# Altium PCB RP2040_PCB_V1T1.PcbDoc
Units mil, origin at the board's own origin, x right, y up, seen from the top; angles counter-clockwise.
Board outline 1385.83 x 2165.35 mil, 4 copper layers (Top Layer, Int1 (GND), Int2 (PWR), Bottom Layer), stack 63.141 mil thick; 53 components, 62 nets, 224 pads, 78 vias.
Unrouted connection lines stored in the file: 2.
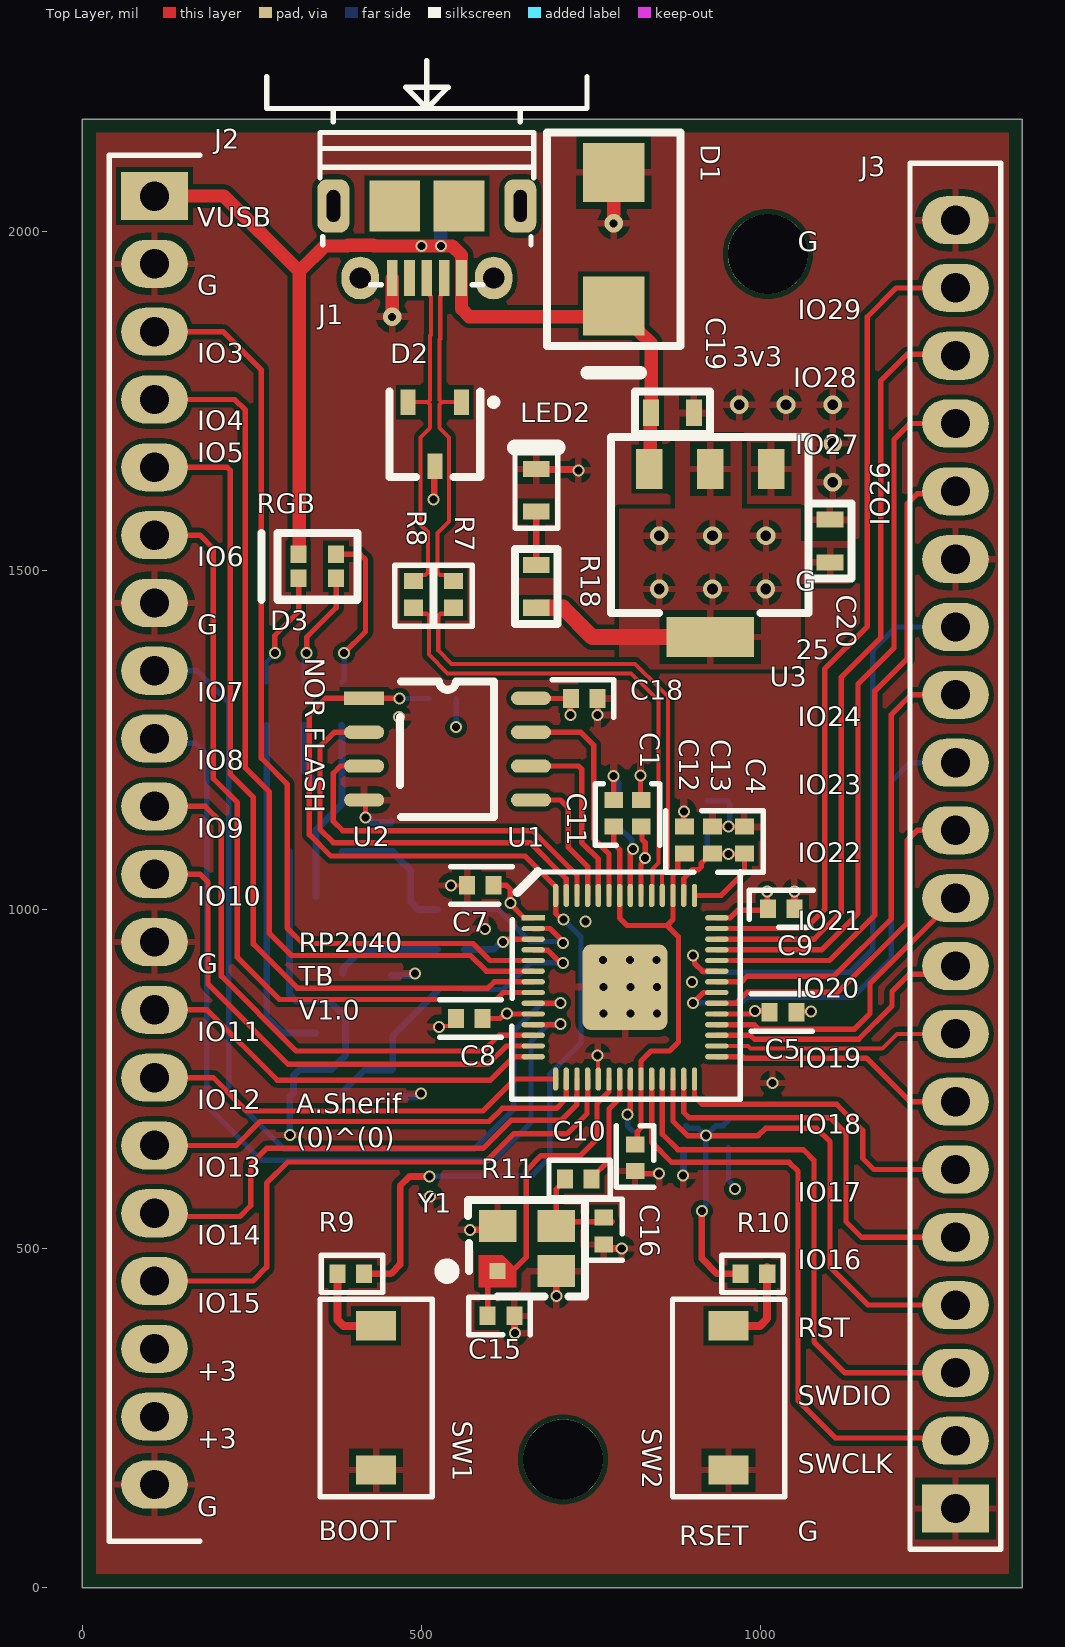
[diagram p0: Top Layer view]
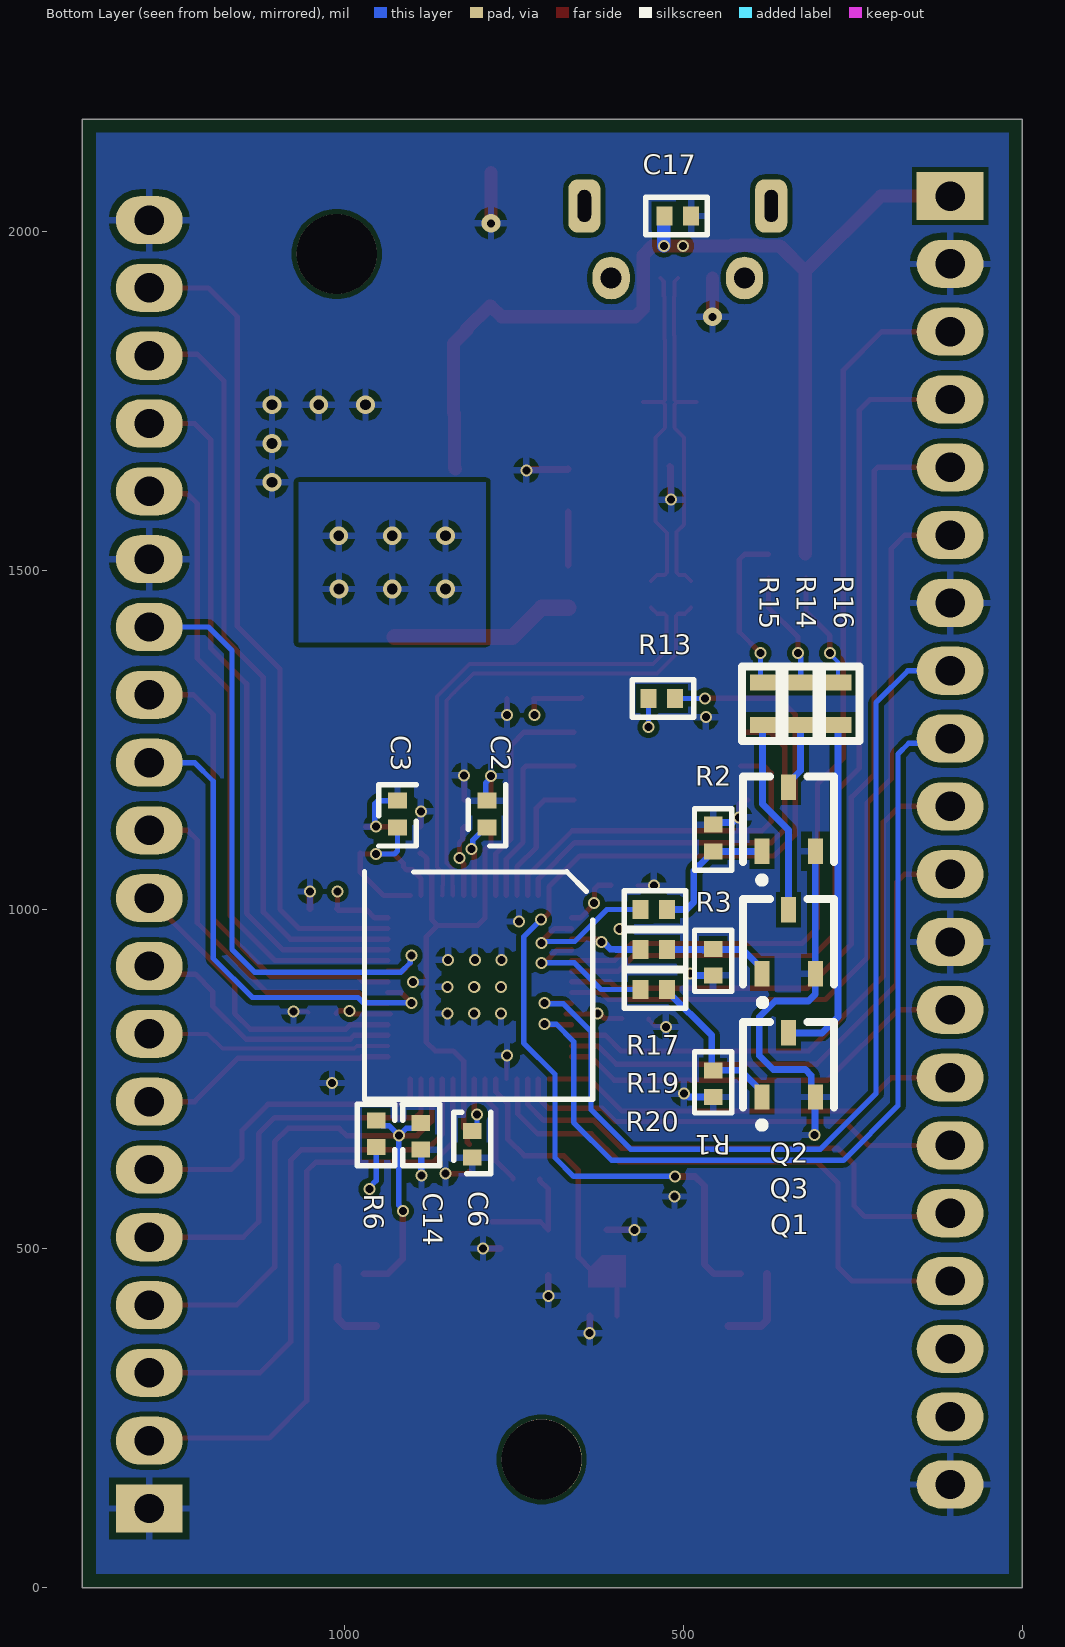
[diagram p1: Bottom Layer view, seen from below]
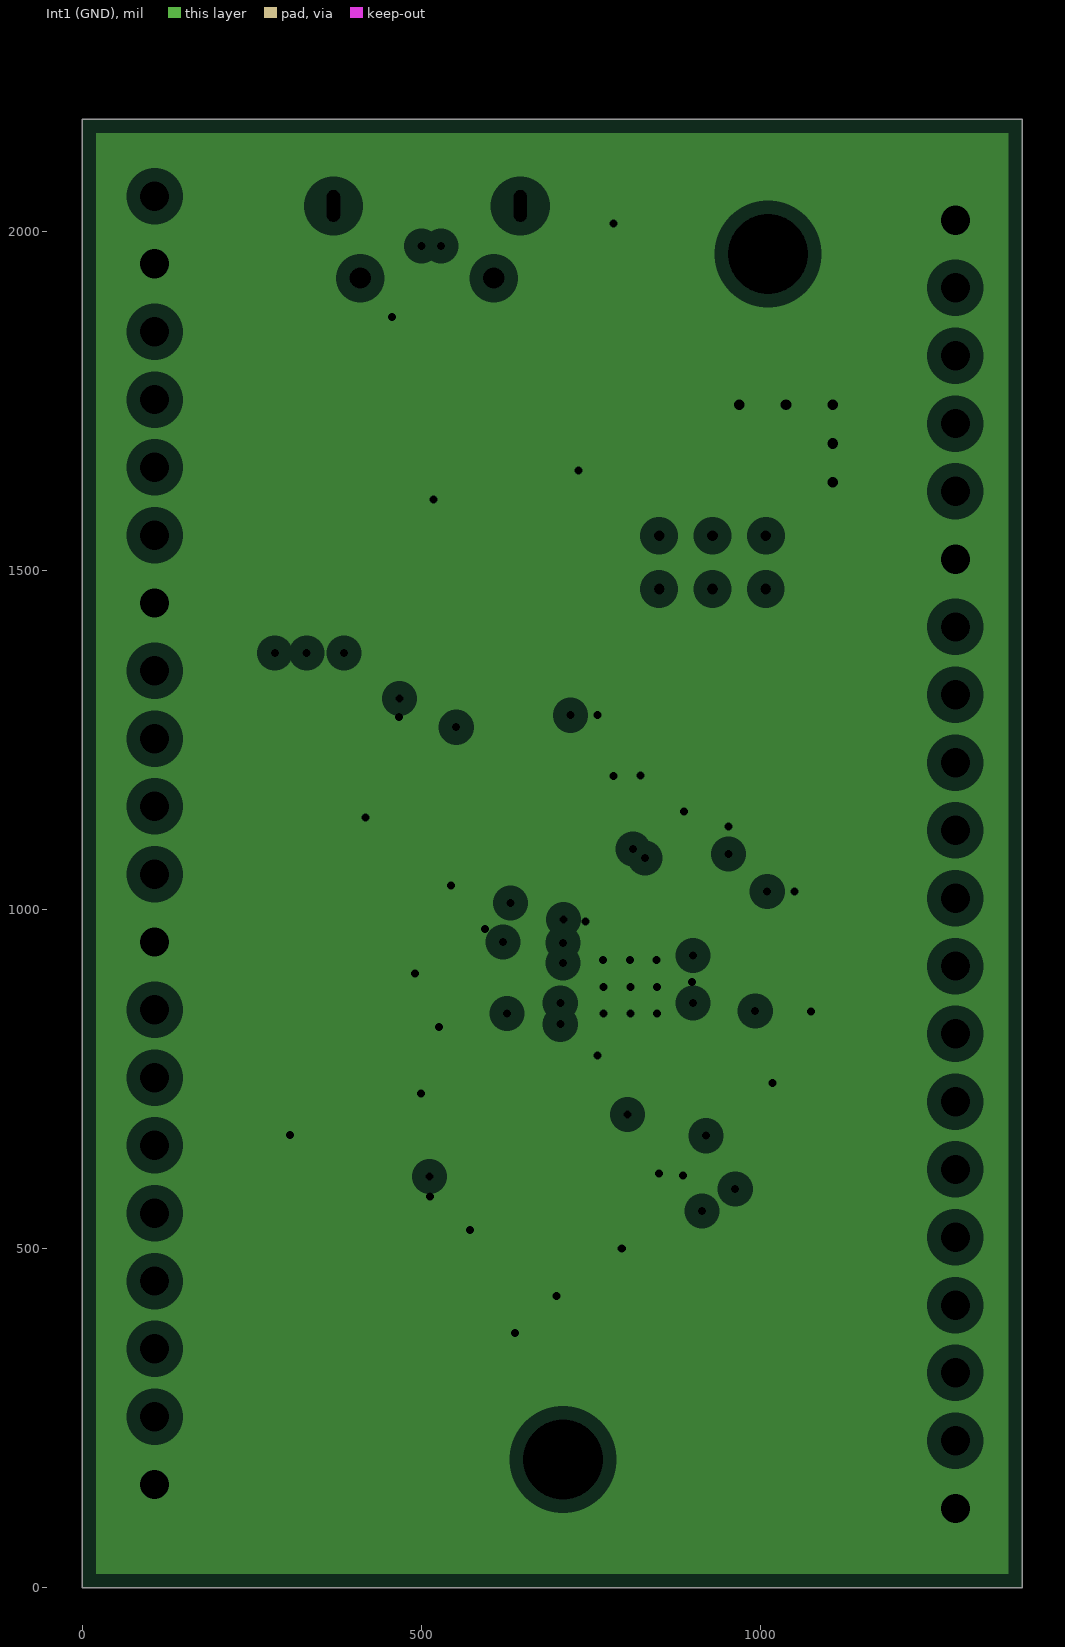
[diagram p2: Int1 (GND), clearances drawn from the general rule]
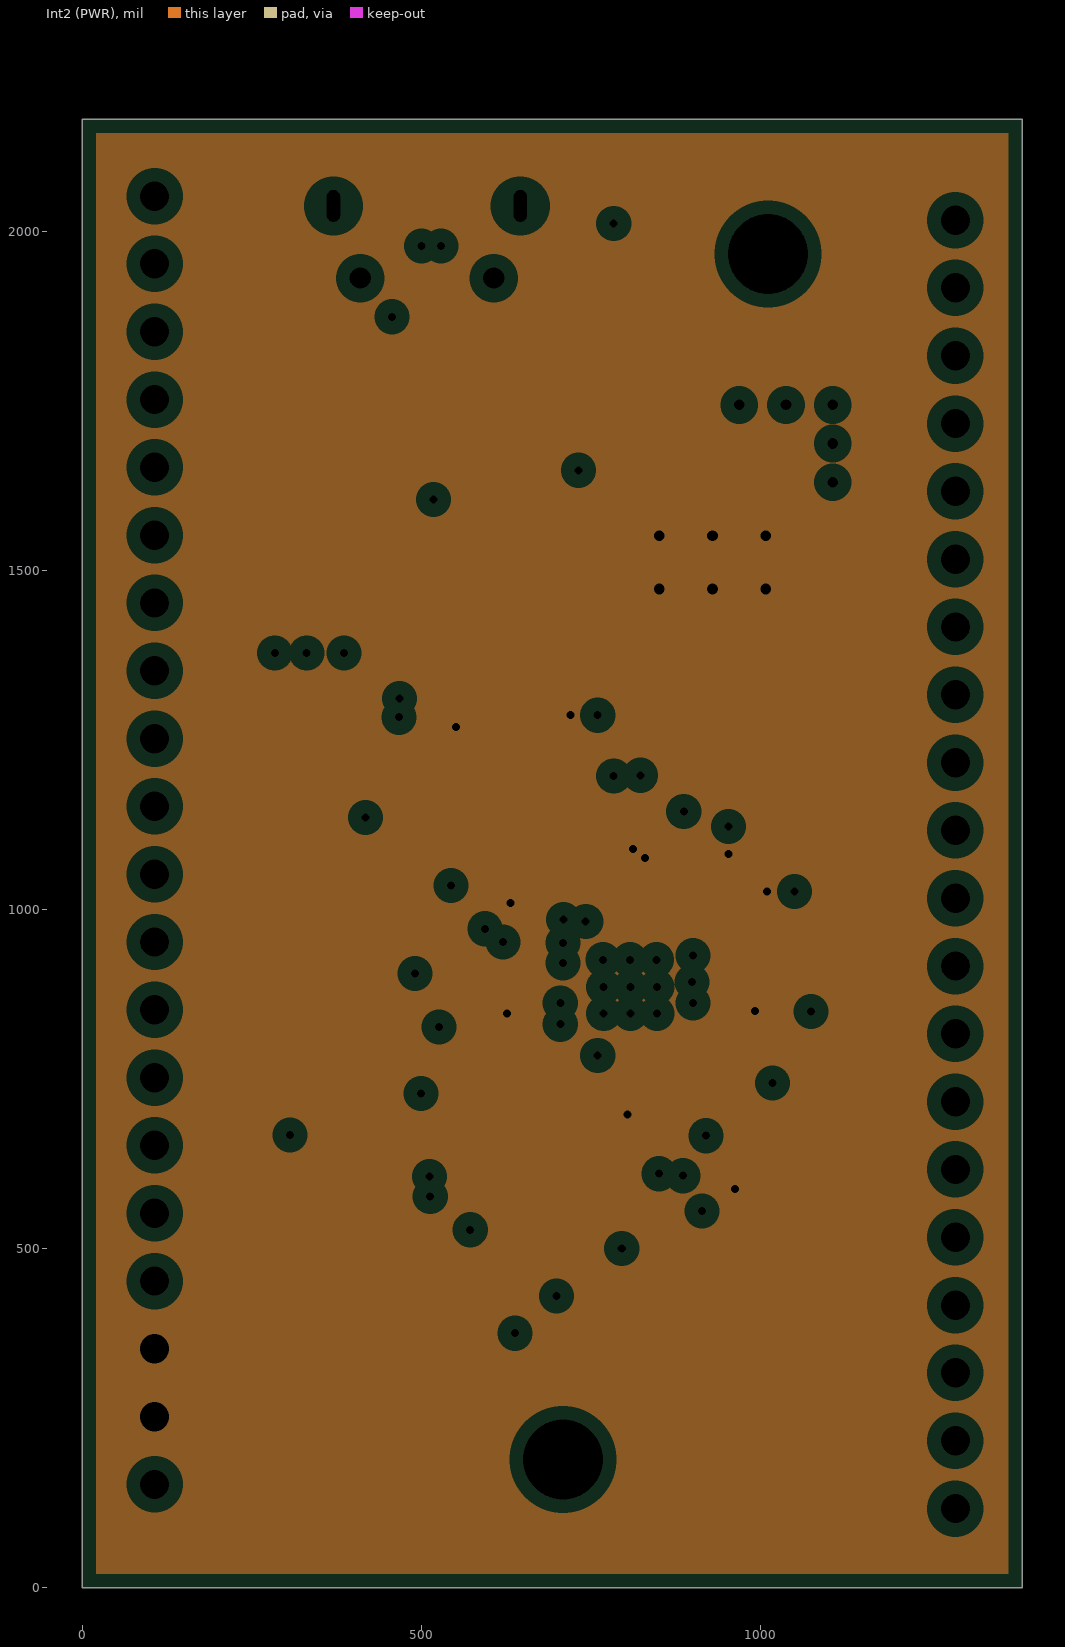
[diagram p3: Int2 (PWR), clearances drawn from the general rule]
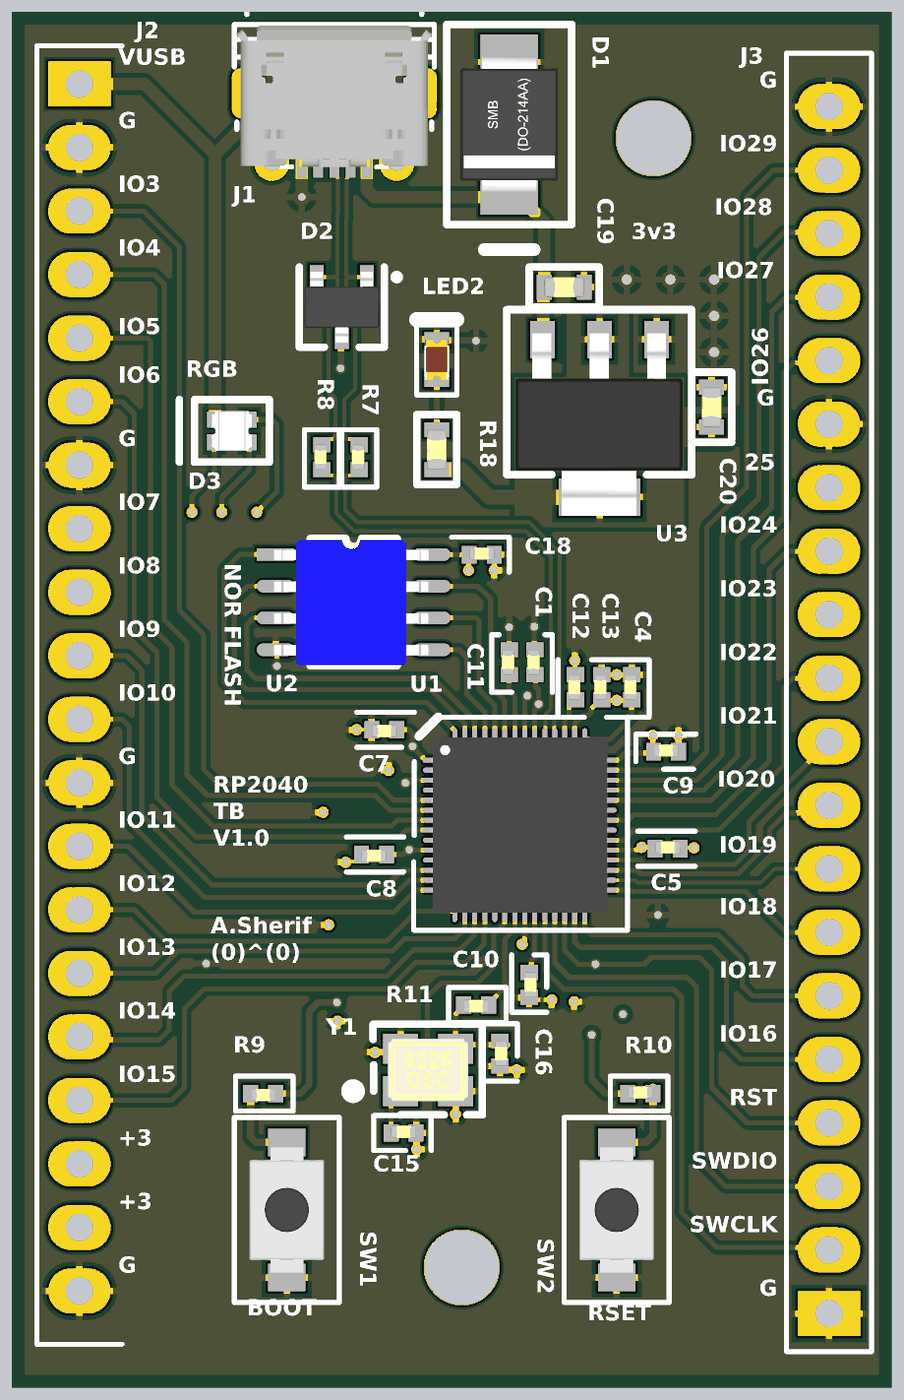
[diagram p4: 3D render of the assembled board from above, using the file's embedded part models]
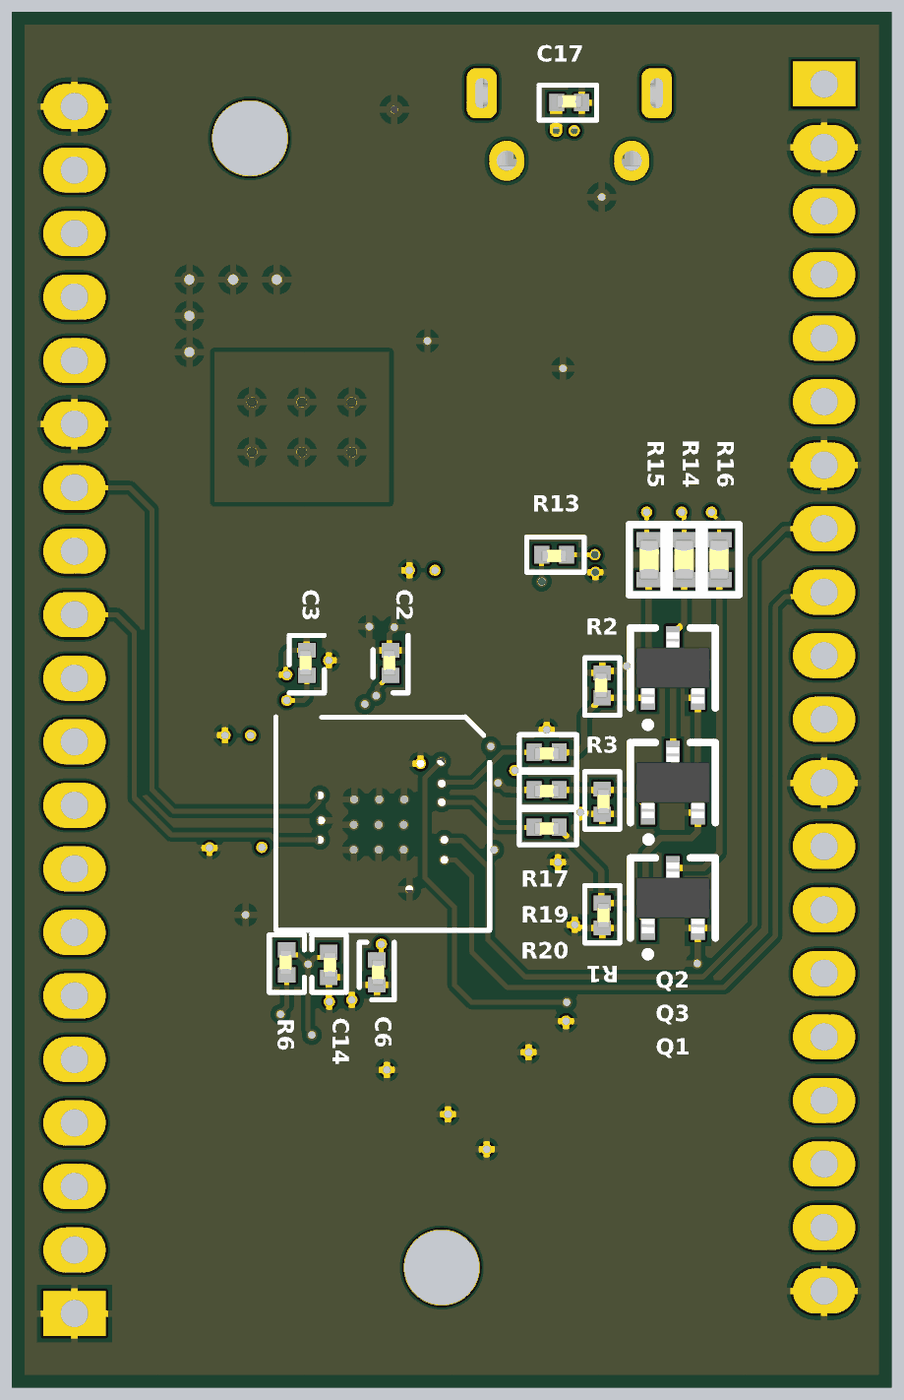
[diagram p5: 3D render of the assembled board from below, using the file's embedded part models]

## Layer stack, top to bottom
Top Solder: solder mask 1, SM-001, Dk 4
Top Layer: signal copper 1.378
Dielectric 1: prepreg 3.913, PP-022, Dk 4.1
Int1 (GND): plane copper 0.689, net GND
Dielectric 3: core 51.1811, Core-012, Dk 4.36
Int2 (PWR): plane copper 0.689, net +3V3
Dielectric 5: prepreg 3.913, PP-022, Dk 4.1
Bottom Layer: signal copper 1.378
Bottom Solder: solder mask 1, SM-001, Dk 4

## Board outline
0,0 0,2165.35 1385.83,2165.35 1385.83,0

## Design rules (kind name [scope] priority, off if disabled: settings)
BoardOutlineClearance [IsPolygon] p1: gap=19.68 ignorepadtopadclearanceinfootprint=FALSE
Clearance [All] p1: gap=7 ignorepadtopadclearanceinfootprint=FALSE
DiffPairsRouting DiffPairsRouting_1 [All] p1: maxlimit=10 minlimit=10 mostfreqgap=10 toplayer_minwidth=15 toplayer_maxwidth=15 toplayer_prefwidth=15 bottomlayer_minwidth=15 bottomlayer_maxwidth=15 bottomlayer_prefwidth=15 maxuncoupledlength=500
DiffPairsRouting [All] p2: maxlimit=8 minlimit=8 mostfreqgap=8 toplayer_minwidth=6 toplayer_maxwidth=6 toplayer_prefwidth=6 bottomlayer_minwidth=6 bottomlayer_maxwidth=6 bottomlayer_prefwidth=6 impedanceprofiledriven=TRUE impedanceprofileid={495766B8-8285-4574-975D-805B55BF311E} impedanceprofilevalue=90.000000 maxuncoupledlength=500
HoleSize [All] p1: absolutevalues=TRUE maxlimit=196.85 minlimit=1 maxpercent=80.000 minpercent=20.000
MinimumSolderMaskSliver [All] p1: minsoldermaskwidth=5.91
PlaneClearance [All] p1: clearance=20
PlaneConnect [isVia] p1: pad.planeconnectstyle=Relief pad.reliefexpansion=20 pad.reliefentries=4 pad.reliefconductorwidth=10 pad.reliefairgap=10 via.planeconnectstyle=Direct via.reliefexpansion=20 via.reliefentries=4 via.reliefconductorwidth=10 via.reliefairgap=10
PolygonConnect [All] p1: connectstyle=Relief reliefconductorwidth=10 reliefentries=4 polygonreliefangle="90 Angle" airgapwidth=10
RoutingVias [All] p1: holewidth=19.68 width=25.59 viastyle="Through Hole" minholewidth=11.81 minwidth=17.72 maxholewidth=23.62 maxwidth=29.53
SilkToSolderMaskClearance [IsPad] p1: minsilkscreentomaskgap=0 clearancetoexposedcopper=FALSE
SolderMaskExpansion [All] p1: expansion=4 istentingtop=FALSE
UnRoutedNet [All] p1: checkbadconnections=TRUE
Width Width_1 [All] p1: maxlimit=200 minlimit=6 preferedwidth=20
23 further rules are at their usual default settings.

## Classes and differential pairs
component class U_RP2040_Schem: C1 C2 C3 C4 C5 C6 C7 C8 C9 C10 C11 C12 C13 C14 C15 C16 R6 R7 R8 R11 S U1 Y1
component class Board_Schem_USB_Micro: C17 C18 C19 C20 D1 D2 D3 J1 J2 J3 LED2 Q1 Q2 Q3 R1 R2 R3 R9 R10 R13 R14 R15 R16 R17 R18 R19 R20 SW1 SW2 U2 U3
differential pair R_D: +R_D_P -R_D_N
differential pair D: +D_P -D_N

## Components (designator, comment, footprint, x,y, rotation, side; value= is the part's Value field where it differs from the comment)
C1 "0402_100n" 0402#1 823.82,1161.42 r270 top
C2 "0402_100n" 0402#2 789.37,1160.43 r270 bottom
C3 "0402_100n" 0402#1 921.26,1160.43 r270 bottom
C4 "0402_100n" 0402#3 976.38,1122.05 r270 top
C5 "0402_100n" 0402#3 1052.87,848.15 r180 top
C6 "0402_100n" 0402#2 811.02,633.86 r90 bottom
C7 "0402_100n" 0402#3 566.93,1035.43 r0 top
C8 "0402_100n" 0402#3 550.69,839.07 r0 top
C9 "0402_100n" 0402#3 1050.2,1000.98 r180 top
C10 "0402_100n" 0402#3 814.96,614.17 r90 top
C11 "0402_100n" 0402#1 783.46,1161.42 r270 top
C12 "0402_1u" 0402#3 887.8,1122.05 r270 top
C13 "0402_1u" 0402#3 929.13,1122.05 r270 top
C14 "0402_1u" 0402#2 886.81,645.67 r90 bottom
C15 "0402_20pF" 0402#3 636.81,400.59 r180 top
C16 "0402_20pF" 0402#3 768.7,505.97 r90 top
C17 "0402_100n" 0402#2 488.19,2022.64 r0 bottom
C18 "0402_100n" 0402#3 759.84,1311.02 r180 top
C19 "0603_10u" 0603_CAP#1 901.57,1732.28 r180 top
C20 "0603_10u" 0603_CAP#1 1102.36,1574.8 r270 top
D1 "SMBJ5.0A" D0-214AA 783.46,1889.76 r90 top
D2 "NUP2105L" SO-23 519.69,1700.79 r180 top
D3 "19-237/R6GHBHC-M01/2T" 19-237/R6GHBHC-M01/2T 318.9,1488.19 r180 top
J1 "10118193-0001LF" "Micro USB" 507.87,1984.25 r180 top
J2 "FEMALE HDRS 20x1 2.54mm" "FHDR 1x20 2.54mm" 106.3,1701.97 r0 top
J3 "FEMALE HDRS 20x1 2.54mm" "FHDR 1x20 2.54mm" 1287.4,466.54 r180 top
LED2 "0603_Red" 0603_LED 669.29,1586.61 r90 top
Q1 "2N7002" "SO-23 - MOSFET" 344.49,770.67 r180 bottom
Q2 "2N7002" "SO-23 - MOSFET" 344.49,1132.87 r180 bottom
Q3 "2N7002" "SO-23 - MOSFET" 344.49,952.26 r180 bottom
R1 "0402_10k" 0402#2 455.71,723.43 r90 bottom
R2 "0402_10k" 0402#2 455.71,1125 r270 bottom
R3 "0402_10k" 0402#2 455.71,902.56 r90 bottom
R6 "0402_10k" 0402#2 952.76,688.98 r270 bottom
R7 "0402_27R" 0402#3 547.24,1484.25 r270 top
R8 "0402_27R" 0402#3 488.19,1484.25 r270 top
R9 "0402_1k" 0402#2 375.98,462.6 r0 top
R10 "0402_1k" 0402#2 1009.84,462.6 r180 top
R11 "0402_1k" 0402#2 711.61,602.36 r0 top
R13 "0402_10k" 0402#2 551.18,1311.02 r180 bottom
R14 "0603_1k" 0603_CAP#2 326.77,1271.65 r90 bottom
R15 "0603_1k" 0603_CAP#2 381.89,1271.65 r90 bottom
R16 "0603_1k" 0603_CAP#2 271.65,1271.65 r90 bottom
R17 "0402_100" 0402#2 562.99,1000 r180 bottom
R18 "0603_1k" 0603_CAP#1 669.29,1507.87 r270 top
R19 "0402_100" 0402#2 562.99,940.94 r180 bottom
R20 "0402_100" 0402#2 562.99,881.89 r180 bottom
SW1 "ZX-QC34-2TPDZ" "2padSMD- 2*3*4" 433.07,279.53 r90 top
SW2 "ZX-QC34-2TPDZ" "2padSMD- 2*3*4" 952.76,279.53 r90 top
U1 "RP2040" QFN56 800.09,885.27 r0 top locked
U2 "W25Q128JVSIQ" SOIC-8 415.35,1311.42 r0 top
U3 "AMS1117-3.3" SOT-223 1015.75,1649.61 r180 top
Y1 "X322512MSB4SI" 3225_Crystal 612.2,466.54 r0 top

## Footprints (in the part's own frame and the unit in brackets; to place one, negate y for a bottom-side part, rotate by r counter-clockwise, add the part's x,y. Pads: shape width x height; smd on the part's side, far side on the other; paste and mask are expansions set on the pad)
"2padSMD- 2*3*4" [mm]
  rect 1.1x1.5 smd mask+0.1: 1(-2.7,0) 2(2.7,0)
  silkscreen extent -3.7,-2.1 3.7,2.1, body extent -2.5,-1.5 2.5,1.5, height 1.93
19-237/R6GHBHC-M01/2T [mm]
  rect 0.6x0.65 smd mask+0.05: 1(0,0) 2(-1.4,0) 3(0,-0.9) 4(-1.4,-0.9)
  silkscreen extent -2.2,-1.7 1.4,0.8, body extent -1.5,-1.25 0.1,0.35, height 0.5
0402#1 [mm]
  rect 0.6x0.7 smd mask+0.05: 1(0,0) 2(1,0)
  silkscreen extent -0.6,0.4 1.7,0.7, body extent 0,-0.3 1,0.2, height 0.25
0402#2 [mm]
  rect 0.6x0.7 smd: 1(0,0) 2(1,0)
  silkscreen extent -0.6,-0.7 1.7,0.7, body extent 0,-0.3 1,0.2, height 0.25
0402#3 [mm]
  rect 0.6x0.7 smd mask+0.1: 1(0,0) 2(1,0)
  silkscreen extent -0.6,-0.7 1.7,0.7, body extent 0,-0.3 1,0.2, height 0.25
0603_CAP#1 [mm]
  rect 0.6x1 smd mask+0.1: 1(0,0) 2(1.6,0)
  silkscreen extent -0.6,-0.8 2.2,0.8, body extent 0,-0.4 1.6,0.4, height 0.81
0603_CAP#2 [mm]
  rect 0.6x1 smd: 1(0,0) 2(1.6,0)
  silkscreen extent -0.6,-0.8 2.2,0.8, body extent 0,-0.4 1.6,0.4, height 0.81
0603_LED [mm]
  rect 0.6x1 smd mask+0.1: 1(0,0) 2(1.6,0)
  silkscreen extent -0.62,-0.8 2.4,0.8, body extent -0.01,-0.5 1.61,0.5, height 0.98
3225_Crystal [mm]
  rect 0.6x0.6 smd paste+0 mask+0: 1(0,0)
  rect 1.4x1.2 smd: 2(2.2,0) 3(2.2,1.7) 4(0,1.7)
  Top Layer region: -0.7,0.6 -0.7,-0.6 0.7,-0.6 0.7,0.1 0.2,0.6
  silkscreen extent -2.12,-0.95 3.27,2.68, body extent -0.5,-0.4 2.7,2.1, height 0.71
D0-214AA [mm]
  rect 2.2x2.3 smd mask+0.1: A(5,0) K(0,0)
  silkscreen extent -2.5,-2.5 6.5,2.5, body extent -0.25,-1.95 5.25,1.95, height 2.45
"FHDR 1x20 2.54mm" [mm]
  rect 2.5x1.8 hole 1.1: 1(0,8.89)
  oval 2.5x1.8 hole 1.1: 2(0,6.35) 3(0,3.81) 4(0,1.27) 5(0,-1.27) 6(0,-3.81) 7(0,-6.35) 8(0,-8.89) 9(0,-11.43) 10(0,-13.97) 11(0,-16.51) 12(0,-19.05) 13(0,-21.59) 14(0,-24.13) 15(0,-26.67) 16(0,-29.21) 17(0,-31.75) 18(0,-34.29) 19(0,-36.83) 20(0,-39.37)
  silkscreen extent -1.7,-41.5 1.7,10.41
"Micro USB" [mm]
  rect 0.4x1.35 smd mask+0.05: 1(-1.3,1.35) 2(-0.65,1.35) 3(0,1.35) 4(0.65,1.35) 5(1.3,1.35)
  oval 1.4x1.6 hole 0.8 mask+0.05: 6(-2.5,1.35) 7(2.5,1.35)
  rrect60% 1.2x2 hole 0.5 slot 1.2 at 90 deg: 8(-3.5,-1.35) 9(3.5,-1.35)
  rect 1.9x1.9 smd mask+0.1: 10(-1.2,-1.35) 11(1.2,-1.35)
  silkscreen extent -6,-6.8 6,1.6, body extent -3.93,-4.06 3.93,1.6, height 2.87
QFN56 [mm]
  rect 0.875x0.2 smd mask+0.1: 1(-3.437,2.6)
  oval 0.875x0.2 smd mask+0.1: 2(-3.437,2.2) 3(-3.437,1.8) 4(-3.437,1.4) 5(-3.437,1) 6(-3.437,0.6) 7(-3.437,0.2) 8(-3.437,-0.2) 9(-3.437,-0.6) 10(-3.437,-1) 11(-3.437,-1.4) 12(-3.437,-1.8) 13(-3.437,-2.2) 14(-3.437,-2.6) 29(3.437,-2.6) 30(3.437,-2.2) 31(3.437,-1.8) 32(3.437,-1.4) 33(3.437,-1) 34(3.437,-0.6) 35(3.437,-0.2) 36(3.437,0.2) 37(3.437,0.6) 38(3.437,1) 39(3.437,1.4) 40(3.437,1.8) 41(3.437,2.2) 42(3.437,2.6)
  oval 0.2x0.875 smd mask+0.1: 15(-2.6,-3.437) 16(-2.2,-3.437) 17(-1.8,-3.437) 18(-1.4,-3.437) 19(-1,-3.437) 20(-0.6,-3.437) 21(-0.2,-3.437) 22(0.2,-3.437) 23(0.6,-3.437) 24(1,-3.437) 25(1.4,-3.437) 26(1.8,-3.437) 27(2.2,-3.437) 28(2.6,-3.437) 43(2.6,3.437) 44(2.2,3.437) 45(1.8,3.437) 46(1.4,3.437) 47(1,3.437) 48(0.6,3.437) 49(0.2,3.437) 50(-0.2,3.437) 51(-0.6,3.437) 52(-1,3.437) 53(-1.4,3.437) 54(-1.8,3.437) 55(-2.2,3.437) 56(-2.6,3.437)
  rrect20% 3.2x3.2 smd mask+0.1: 57(0,0)
  silkscreen extent -4.25,-4.2 4.31,4.32, body extent -3.49,-3.51 3.52,3.5, height 0.9
SO-23 [mm]
  rect 0.56x0.95 smd mask+0.1: 1(-1,-1.2) 2(1,-1.2) 3(0,1.2)
  silkscreen extent -2.3,-1.6 1.7,1.6, body extent -1.5,-1.42 1.5,1.42, height 1.2
"SO-23 - MOSFET" [mm]
  rect 0.56x0.95 smd: D(0,1.2) G(-1,-1.2) S(1,-1.2)
  silkscreen extent -1.7,-2.35 1.7,1.6, body extent -1.5,-1.42 1.5,1.42, height 1.2
SOIC-8 [mm]
  rect 1.5x0.5 smd mask+0.1: 1(0,0)
  oval 1.5x0.5 smd mask+0.1: 2(0,-1.27) 3(0,-2.54) 4(0,-3.81) 5(6.25,-3.81) 6(6.25,-2.54) 7(6.25,-1.27) 8(6.25,0)
  silkscreen extent 1.35,-4.44 4.86,0.64, body extent -0.07,-4.43 6.12,0.58, height 1.62
SOT-223 [mil]
  rect 39x59 smd mask+3.94: 1(180,0) 2(0,0) 3(90,0)
  rect 129x59 smd mask+3.94: 4(90,248)
  silkscreen extent -55,-47 236,213, body extent -41,-10 222,278, height 71

## Part data
C1 C2 C3 C4 C5 C6 C7 C8 C9 C10 C11 C12 C13 C14 C15 C16 C17 C18: library part "0402 Capacitor"
C19 C20: library part "0603 Capacitor"
D2: "ESD Protection Dual Diode for CAN Bus Line Protection"
D3: "Red, Green, Blue (RGB) 624nm Red, 525nm Green, 470nm Blue LED Indication - Discrete 1.8V Red, 2.65V Green, 2.75V Blue 0606 (1616 Metric)"
J1: "CONN USB MICRO B RECPT SMT R/A", Color=Black, Current Rating=1.8A, Flammability Rating="UL94 V-0", Insulation Resistance=1GR, Manufacturer 1="Amphenol FCI", Max Operating Temperature=85°C, Max Voltage Rating (AC)=100V, Min Operating Temperature=-55°C, Package Quantity=1200, Supplier Part Number 1=609-4616-1-ND, ComponentLink1Description=https://datasheet.ciiva.com/851/10118193-851106.pdf?src-supplier=Digi-Key, ComponentLink1URL=https://datasheet.ciiva.com/851/10118193-851106.pdf?src-supplier=Digi-Key, ComponentLink2Description=https://datasheet.ciiva.com/26853/getdatasheetpartid-418618-26853893.pdf?src-supplier=Verical, ComponentLink2URL=https://datasheet.ciiva.com/26853/getdatasheetpartid-418618-26853893.pdf?src-supplier=Verical, ComponentLink3Description=https://datasheet.ciiva.com/4598/10118193ac-197151-4598799.pdf?src-supplier=Mouser, ComponentLink3URL=https://datasheet.ciiva.com/4598/10118193ac-197151-4598799.pdf?src-supplier=Mouser, ComponentLink4Description=https://datasheet.ciiva.com/14802/10118193-0001lf-webpage-14802386.pdf?src-supplier=Arrow+Electronics, ComponentLink4URL=https://datasheet.ciiva.com/14802/10118193-0001lf-webpage-14802386.pdf?src-supplier=Arrow+Electronics, ComponentLink5Description=https://datasheet.ciiva.com/851/10118193-851107.pdf?src-supplier=Digi-Key, ComponentLink5URL=https://datasheet.ciiva.com/851/10118193-851107.pdf?src-supplier=Digi-Key, ComponentLink6Description=https://datasheet.ciiva.com/851/10118193-851108.pdf?src-supplier=Digi-Key, ComponentLink6URL=https://datasheet.ciiva.com/851/10118193-851108.pdf?src-supplier=Digi-Key, ComponentLink7Description=https://datasheet.ciiva.com/14618/70236827-14618887.pdf?src-supplier=Allied+Electronics, ComponentLink7URL=https://datasheet.ciiva.com/14618/70236827-14618887.pdf?src-supplier=Allied+Electronics, Connector Type=USB,Receptacle, Contact Material="Copper Alloy", Contact Plating=Gold, Depth=5.67mm, Features=Shielded, Gender=Female, Housing Material=Polymer, Length=7.86mm, Manufacturer Part Number 1=10118193-0001LF, Mount="Surface Mount,Horizontal", Number of Contacts=5, Number of Ports=1, Number of Terminals=5, Orientation="Right Angle", Parameter Name 1="Tape and Reel", Pitch=0.65mm, Pricing 1="1=0.45000, 10=0.43000, 25=0.36840, 50=0.31320, 100=0.30090, 250=0.27016, 500=0.25788 (USD)", Radiation Hardening=No, RoHS=Yes, Stock 1=49172, Supplier 1=Digi-Key, Termination=Solder, Voltage Rating=100V
J2 J3: library part "Female Header 1*20", "Board-To-Board Connector, M20 Series, Through Hole, Receptacle, 20, 2.54 mm, Tin Plated Contacts"
LED2: library part 0603LED
Q1 Q2 Q3: "2N7002 7002 N Channel MOSFET SMD 60V 115mA 225mW 7.5Ω@10V,500mA SOT-23"
R1 R2 R3 R6 R7 R8 R9 R10 R11 R13 R17 R19 R20: library part "0402 Resistor"
R14 R15 R16 R18: library part "0603 Resistor"
SW1 SW2: library part "2*3*4 SMD Button 2_Pads", "SWITCH TACTILE SPST 260gf SMD"
U1: Manufacturer="Raspberry Pi", Supplier Part Number 1=2211610, Category=Uncategorized, Manufacturer Part Number=RP2040, Pricing 1="500=0.721, 2500=0.703, 5000=0.692 (GBP)", RoHS=No, Stock 1=6500, Supplier 1=Rs
U2: "3V 128M-BIT SERIAL FLASH MEMORY WITH DUAL/QUAD SPI"
U3: library part "AMS1117 - 3V3", "AMS1117-3.3 Checked Fixed Positive LDO Regulator, 3.3V, 1.3V Dropout, PDSO3 Voltage Regulators - Linear"
Y1: library part 3225_Crystal, "CRYSTAL 12MHz 20pF SMD"

## Free pads (board coordinates)
  round 118.11 hole 118.11: 1(708.66,188.98) 1(1010.83,1966.54)

## Via types
v1: diameter 17.72, hole 11.81, Top Layer to Bottom Layer, 65 vias
v2: diameter 27.56, hole 15.75, Top Layer to Bottom Layer, 11 vias
v3: diameter 27.56, hole 11.81, Top Layer to Bottom Layer, 2 vias

## Nets (pads, with @x,y where several pads share a name; then routed paths per layer and width w, separated by ;. In a path a pad name is that pad's centre, name@x,y a point inside that pad or via, vN(x,y) a via of type N, cw(c..) or ccw(c..) an arc to the next point about the centre after c; other vN are vias at no path point)
+1V1: C10.2 C11.2 C12.2 U1.23 U1.45 U1.50 | length 702.9
  Top Layer w7.87: C11.2 783.46,1097.1 792.21,1088.36 792.21,987.31 803.15,976.38 862.2,976.38 ; C10.2 818.22,656.8 818.22,672.55 823.71,678.04 U1.23 823.71,776.47 838.58,791.34 865.47,791.34 878.94,804.81 878.94,959.65 864.27,974.31 862.2,976.38 ; C12.2 885.83,1082.68 877.95,1074.8 877.95,1058.1 876.52,1056.67 876.52,1056.4 870.95,1050.84 U1.45 870.95,985.13 862.2,976.38
+3V3: C1.2 C2.2 C3.2 C4.2 C5.2 C6.2 C7.2 C8.2 C9.2 C13.2 C18.2 C20.2 J2.18 J2.19 R6.2 R13.1 R18.2 U1.1 U1.10 U1.22 U1.33 U1.42 U1.43 U1.44 U1.48 U1.49 U2.8 U3.3 U3.4 | length 1462.1
  Top Layer w7.87: C8.2 615.94,839.07 623.32,846.46 v1(625.98,846.46) 626.54,845.9 U1.10@672.63,845.9 ; C7.2 625.31,1035.43 630.8,1029.94 630.8,1009.78 v1(631.32,1009.27) ; v1@631.23,1007.87 651.47,987.63 U1.1 ; U2.8@649.61,1312.6 651.18,1311.02 C18.2 719.49,1310.04 v1(719.49,1286.42) ; v1(803.91,697.83) 803.91,700.5 807.96,704.55 U1.22 ; U1.49 807.96,1082.32 812.01,1086.37 v1(812.01,1089.04) ; C1.2@822.83,1122.05 825.11,1119.77 825.11,1103.04 829.72,1098.43 829.72,1073.12 823.71,1067.11 U1.48 ; U1.44 886.7,1045.55 899.44,1058.29 907.9,1058.29 912.51,1062.9 912.51,1068.02 927.17,1082.68 C13.2 930.12,1081.69 v1(952.76,1081.69) 975.39,1081.69 C4.2 976.38,1055.12 941.87,1020.61 U1.43 ; U1.33@931.48,845.9 984.97,845.9 989.46,850.39 1007.87,850.39 C5.2@1011.81,846.46 ; U1.42 955.15,987.63 966.54,999.02 1008.86,999.02 C9.2 1009.84,1001.97 v1(1009.84,1026.57)
  Top Layer w23.62: R18.2 708.66,1444.88 751.94,1401.61 U3.4
  Bottom Layer w7.87: v1(551.18,1268.7) R13.1 ; C2.2@791.34,1121.06 810.13,1102.28 810.13,1090.92 v1(812.01,1089.04) ; v1(803.91,697.83) 803.91,680.34 C6.2 ; C3.2 921.26,1086.31 925.87,1081.69 v1(952.76,1081.69) ; R6.2 952.76,600.1 962.6,590.26 v1(962.6,587.6)
  other v1: 992.13,850.39 829.72,1075.79
  other v2: 850.39,1472.44 929.13,1472.44 1007.64,1472.59 850.39,1551.18 929.13,1551.18 1007.87,1551.18
D_N: D2.1 J1.2 R7.1 | length 510.7
  Top Layer w6: J1.2 528.59,1926.23 528.59,1904.93 527.67,1904.01 527.67,1841.26 526.68,1840.28 526.68,1751.55 530.2,1748.03 ; R7.1 538.43,1493.06 527.14,1493.06 523.62,1496.58 523.62,1555.12 540.71,1572.2 540.71,1696.27 526.68,1710.29 526.68,1744.52 530.2,1748.03 ; D2.1 530.2,1748.03
D_P: D2.2 J1.3 R8.1 | length 506
  Top Layer w6: D2.2 509.17,1748.03 ; R8.1 497,1493.06 506.11,1493.06 509.62,1496.58 509.62,1556.33 498.66,1567.29 498.66,1696.27 512.68,1710.29 512.68,1744.52 509.17,1748.03 ; J1.3 512.75,1926.23 512.75,1904.93 513.67,1904.01 513.67,1847.06 512.68,1846.07 512.68,1751.55 509.17,1748.03
GND: C1.1 C2.1 C3.1 C4.1 C5.1 C6.1 C7.1 C8.1 C9.1 C10.1 C11.1 C12.1 C13.1 C14.1 C15.1 C16.1 C17.1 C18.1 C19.1 C20.1 D1.A D2.3 J1.5 J2.2 J2.7 J2.12 J2.20 J3.1 J3.15 J3.20 LED2.2 Q1.S Q2.S Q3.S R1.1 R2.1 R3.1 SW1.1 SW2.1 U1.19 U1.57 U2.4 U3.2 Y1.2 Y1.4 | length 1551
  Top Layer w6: v1(525.59,826.77) 527.11,828.3 541.88,828.3 550.69,837.11 C8.1 ; v1(543.31,1035.43) C7.1 ; v1(759.84,784.45) 760.36,783.93 760.36,750.3 U1.19 ; C5.1 1054.36,849.63 v1(1074.58,849.63)
  Top Layer w7.87: U2.4@404.72,1161.42 411.87,1161.42 417.32,1155.96 v1(417.32,1135.83) ; v1(759.84,1286.42) C18.1 ; C11.1 v1(783.46,1196.85) ; C10.1 818.9,610.24 v1(850.39,610.24) ; C1.1@822.83,1161.42 v1(822.83,1197.83) ; v1(886.81,1144.68) 886.81,1123.03 C12.1 ; C13.1 C4.1@968.5,1122.05
  Top Layer w10: v1(517.72,1604.33) 518.7,1605.31 518.7,1652.56 D2.3 ; v1(571.85,527.56) Y1.4@612.2,527.56 ; v1(637.8,375) 637.3,375.49 637.3,400.1 C15.1@637.8,400.59 ; LED2.2 670.28,1648.62 730.32,1648.62 v1(731.3,1647.64) ; v1(698.82,430.12) Y1.2@698.82,460.63 ; C16.1@769.68,500 v1(795.28,500) ; C9.1 v1(1050.2,1026.57)
  Top Layer w19.68: v3(456.69,1874.02) J1.5 ; v3(783.46,2011.81) D1.A
  Bottom Layer w7.87: v1(783.46,1196.85) 783.46,1194.19 791.34,1186.31 C2.1@791.34,1160.43 ; C3.1 950.03,1160.43 954.64,1155.82 954.64,1123.93 v1(952.76,1122.05)
  Bottom Layer w10: Q2.S 305.12,875 314.96,865.16 364.17,865.16 387.8,841.54 387.8,784.45 367.13,763.78 319.88,763.78 311.14,755.04 311.14,729.45 Q1.S 305.61,722.93 305.61,667.93 v1(306.1,667.43) ; v1(417.32,1135.83) 419.41,1135.83 426.93,1128.31 454.1,1128.31 R2.1@455.71,1129.92 ; R1.1 492.01,723.43 496.93,728.35 v1(499.02,728.35) ; R3.1 485.12,902.56 488.07,905.51 v1(490.16,905.51) ; v1(885.83,607.28) 886.32,607.78 886.32,645.18 C14.1
  other v1: 512.8,576.77 1017.72,744.09 768.7,846.46 808.07,846.46 847.44,846.46 768.7,885.83 808.07,885.83 847.44,885.83 898.62,892.72 767.83,925.75 807.2,925.75 846.57,925.75 593.5,971.46 742.13,982.28 466.54,1283.46
  other v2: 1106.3,1629.92 1106.3,1687.01 968.5,1744.09 1037.4,1744.09 1106.3,1744.09
GPIO3: J2.3 U1.5 | length 1402.1
  Top Layer w7.87: J2.3 207.09,1851.97 263.78,1795.28 263.78,1222.98 301.83,1184.93 301.83,972.77 324.8,949.8 575.79,949.8 600.95,924.64 U1.5
GPIO4: J2.4 U1.6 | length 1338.9
  Top Layer w7.87: J2.4 224.41,1751.97 240.16,1736.22 240.16,1208.66 275.59,1173.23 275.59,964.57 308.07,932.09 572.47,932.09 595.66,908.89 U1.6
GPIO5: J2.5 U1.7 | length 1269.8
  Top Layer w7.87: J2.5 213.5,1651.97 218.11,1647.36 218.11,1199.21 251.97,1165.35 251.97,948.82 316.93,883.86 598,883.86 607.28,893.15 U1.7
GPIO6: J2.6 U1.8 | length 1178.9
  Top Layer w7.87: J2.6 173.23,1551.97 192.91,1532.28 192.91,1192.91 228.35,1157.48 228.35,929.13 290.35,867.13 610.24,867.13 620.51,877.4 U1.8
GPIO7: J2.8 U1.9 | length 1425.3
  Top Layer w7.87: U1.9 704.06,861.65 v1(704.61,862.2)
  Bottom Layer w7.87: J2.8 168.7,1351.97 215.55,1305.12 215.55,728.35 297.46,646.43 577.54,646.43 635.83,704.72 635.83,819.88 677.06,861.11 703.52,861.11 v1(704.61,862.2)
GPIO8: J2.9 U1.11 | length 1352.8
  Top Layer w7.87: U1.11 704.06,830.15 v1(704.61,830.71)
  Bottom Layer w7.87: J2.9 113.19,1245.08 167.32,1245.08 183.07,1229.33 183.07,710.63 263.78,629.92 605.32,629.92 661.42,686.02 661.42,805.12 687.01,830.71 v1(704.61,830.71)
GPIO9: J2.10 U1.12 | length 850.2
  Top Layer w7.87: J2.10 181.1,1151.97 204.72,1128.35 204.72,901.57 314.96,791.34 591.54,791.34 614.6,814.41 U1.12
GPIO10: J2.11 U1.13 | length 773.8
  Top Layer w7.87: J2.11 173.23,1051.97 185.04,1040.16 185.04,889.76 303.15,771.65 598.43,771.65 625.43,798.66 U1.13
GPIO11: J2.13 U1.14 | length 615.8
  Top Layer w7.87: J2.13 183.46,851.97 287.21,748.22 601.57,748.22 636.26,782.91 U1.14
GPIO12: J2.14 U1.15 | length 631.4
  Top Layer w7.87: J2.14 192.91,751.97 242.13,702.76 590.55,702.76 637.73,749.94 U1.15
GPIO13: J2.15 U1.16 | length 664.5
  Top Layer w7.87: J2.15 226.77,651.97 262.03,687.23 599.63,687.23 619.09,706.69 698.82,706.69 713.47,721.35 U1.16
GPIO14: J2.16 U1.17 | length 766.5
  Top Layer w7.87: J2.16 111.02,547.24 232.28,547.24 248.03,562.99 248.03,624.02 271.65,647.64 590.55,647.64 631.89,688.98 705.71,688.98 729.11,712.38 729.11,725.9 729.22,726.02 U1.17
GPIO15: J2.17 U1.18 | length 864.2
  Top Layer w7.87: J2.17 251.18,451.97 271.65,472.44 271.65,596.46 302.71,627.51 594.05,627.51 635.63,669.1 714.37,669.1 743.98,698.71 743.98,719.74 744.97,720.73 U1.18
GPIO16: J3.5 U1.27 | length 602.3
  Top Layer w7.87: U1.27 886.7,700.79 894.58,692.91 1102.36,692.91 1125.98,669.29 1125.98,539.37 1148.82,516.54 J3.5
GPIO17: J3.6 U1.28 | length 479.5
  Top Layer w7.87: U1.28 902.45,724.41 914.26,712.6 1112.37,712.6 1150.67,674.3 1150.67,632.79 1166.93,616.54 J3.6
GPIO18: J3.7 U1.29 | length 379.5
  Top Layer w7.87: U1.29 973.73,782.91 975.96,780.68 1156.32,780.68 1220.47,716.54 J3.7
GPIO19: J3.8 U1.30 | length 362.7
  Top Layer w6: U1.30 981.19,798.66 985.23,794.62 1179.46,794.62 1201.38,816.54 J3.8
GPIO20: J3.9 U1.31 | length 411.5
  Top Layer w7.87: U1.31 985.15,814.41 991,808.56 1144.59,808.56 1193.9,857.86 1193.9,878.94 1219.44,904.48 1275.35,904.48 J3.9
GPIO21: J3.10 U1.32 | length 460.6
  Top Layer w7.87: U1.32 990.44,830.15 997.16,823.43 1138.43,823.43 1161.42,846.42 1161.42,890.55 J3.10
GPIO22: J3.11 U1.34 | length 529.1
  Top Layer w7.87: U1.34 964.01,861.65 980.32,877.95 1114.17,877.95 1216.54,980.32 1216.54,1102.36 1230.71,1116.54 J3.11
GPIO23: J3.12 U1.35 | length 727.7
  Top Layer w7.87: v1(900.59,862.2) 915.78,877.4 U1.35
  Bottom Layer w7.87: v1(900.59,862.2) 971.47,862.2 979.45,870.19 1135.32,870.19 1192.91,927.78 1192.91,1188.98 1220.47,1216.54 J3.12
GPIO24: J3.13 U1.36 | length 703.8
  Top Layer w7.87: U1.36 971.89,893.15 980.32,901.57 1108.27,901.57 1192.91,986.22 1192.91,1287.4 1222.05,1316.54 J3.13
GPIO25: J3.14 U1.37 | length 921.6
  Top Layer w7.87: v1(900.59,932.09) 902.47,930.2 902.47,920.36 913.94,908.89 U1.37
  Bottom Layer w7.87: v1(900.59,932.09) 902.47,930.2 902.47,921.35 916.34,907.48 1131.89,907.48 1165.35,940.94 1165.35,1381.89 1200,1416.54 J3.14
GPIO26: J3.16 U1.38 | length 965.7
  Top Layer w7.87: U1.38 1101.81,924.64 1168.31,991.14 1168.31,1322.83 ; 1169.29,1322.83 1216.54,1370.08 1216.54,1598.43 1230.99,1612.88 1283.75,1612.88 J3.16
GPIO27: J3.17 U1.39 | length 1051.7
  Top Layer w7.87: U1.39 1090,940.39 1143.7,994.09 1143.7,1332.68 1196.85,1385.83 1196.85,1692.91 1220.47,1716.54 J3.17
GPIO28: J3.18 U1.40 | length 1135.1
  Top Layer w7.87: U1.40 1079.17,956.14 1119.09,996.06 1119.09,1342.52 ; 1119.42,1342.52 1177.17,1400.26 1177.17,1779.53 1216.54,1818.9 1285.04,1818.9 J3.18
GPIO29: J3.19 U1.41 | length 1218.4
  Top Layer w7.87: U1.41 1066.37,971.89 1094.49,1000 1094.49,1354.33 1157.48,1417.32 1157.48,1874.02 1200,1916.54 J3.19
NetD3_1: D3.1 R16.2 | length 173.1
  Top Layer w7.87: v1(283.57,1377.95) 283.57,1403.88 318.9,1439.2 D3.1
  Bottom Layer w6: R16.2 271.65,1364.62 283.57,1376.54 v1(283.57,1377.95)
NetD3_2: D3.2 R14.2 | length 173.1
  Top Layer w7.87: v1(330.71,1377.95) 330.71,1401.57 374.02,1444.88 D3.2
  Bottom Layer w7.87: R14.2 326.77,1371.35 330.71,1375.29 v1(330.71,1377.95)
NetD3_4: D3.4 R15.2 | length 242.3
  Top Layer w7.87: D3.4 409.45,1523.62 417.32,1515.75 417.32,1409.45 v1(385.83,1377.95)
  Bottom Layer w7.87: R15.2 385.83,1338.58 v1(385.83,1377.95)
NetLED2_1: LED2.1 R18.1 | length 78.7
  Top Layer w10: R18.1 LED2.1
NetQ1_D: Q1.D R16.1 | length 512.7
  Bottom Layer w10: R16.1 271.65,841.54 295.28,817.91 Q1.D
NetQ1_G: Q1.G R1.2 R20.2 | length 239.9
  Bottom Layer w10: Q1.G 383.86,731.1 415.55,762.8 R1.2 457.68,764.76 457.68,813.98 523.62,879.92 R20.2
NetQ2_D: Q2.D R14.1 | length 98.5
  Bottom Layer w10: R14.1 326.77,1204.53 343.5,1187.8 Q2.D@343.5,1180.12
NetQ2_G: Q2.G R2.2 R17.2 | length 204.5
  Bottom Layer w10: Q2.G@382.87,1085.63 R2.2 457.68,1085.63 464.49,1078.82 464.49,1076.85 484.25,1057.09 484.25,1010.83 495.08,1000 R17.2
NetQ3_D: Q3.D R15.1 | length 269.3
  Bottom Layer w10: 344.49,1018.7 344.49,1117.13 382.87,1155.51 382.87,1270.67 R15.1
NetQ3_G: Q3.G R3.2 R19.2 | length 159.4
  Bottom Layer w10: Q3.G 383.86,908.46 384.84,909.45 384.84,913.68 412.11,940.94 R3.2@455.59,940.94 ; R3.2@455.71,939.96 470.04,939.96 471.02,940.94 R19.2
NetR9_1: R9.1 SW1.2 | length 128.7
  Top Layer w11.81: R9.1 375.98,394.69 384.84,385.83 SW1.2
NetR10_1: R10.1 SW2.2 | length 137.4
  Top Layer w11.81: SW2.2 999.02,385.83 1009.84,396.65 R10.1@1009.84,472.44
QSPI_SCLK: U1.52 U2.6 | length 273.1
  Top Layer w7.87: U2.6 731.61,1211.42 736.22,1206.8 736.22,1098.79 760.72,1074.29 U1.52
QSPI_SD0: U1.53 U2.5 | length 200.8
  Top Layer w7.87: U2.5 704.72,1161.42 716.54,1149.61 716.54,1091.54 744.97,1063.1 U1.53
QSPI_SD1: U1.55 U2.2 | length 613.6
  Top Layer w7.87: U2.2 371.65,1261.42 350.39,1240.16 350.39,1118.11 370.08,1098.43 660.14,1098.43 713.47,1045.09 U1.55
QSPI_SD2: U1.54 U2.3 | length 542.4
  Top Layer w7.87: U2.3 380.71,1211.42 370.08,1200.79 370.08,1129.92 383.97,1116.03 663.57,1116.03 729.22,1050.38 U1.54
QSPI_SD3: U1.51 U2.7 | length 331.4
  Top Layer w7.87: U2.7 734.65,1261.42 754.16,1241.91 754.16,1104.11 776.47,1081.8 U1.51
QSPI_SS_N: R9.2 R13.2 U1.56 U2.1 | length 1608.1
  Top Layer w7.87: v1(467.52,1311.02) 467.32,1311.22 415.55,1311.22 U2.1 358.66,1311.42 334.65,1287.4 334.65,1110.24 366.14,1078.74 652.88,1078.74 697.73,1033.89 U1.56 697.73,994.4 705,987.12 707.76,987.12 v1(709.65,985.24)
  Top Layer w10: R9.2 454.72,462.6 468.5,476.38 468.5,592.52 482.28,606.3 v1(511.81,606.3)
  Bottom Layer w7.87: v1(467.52,1311.02) R13.2 ; v1(511.81,606.3) 661.42,606.3 688.98,633.86 688.98,756.89 735.24,803.15 735.24,959.65 v1(709.65,985.24)
R_D_N: R7.2 U1.46 | length 742.3
  Top Layer w6: R7.2 538.43,1436.07 528.23,1436.07 524.72,1432.56 524.72,1381.89 544.4,1362.2 814.96,1362.2 823.16,1354 843.39,1333.77 863.19,1313.98 863.19,1062.78 854.33,1053.93 854.33,1036.09 854.85,1035.58 854.85,1020.97 U1.46
R_D_P: R8.2 U1.47 | length 742.3
  Top Layer w6: R8.2 497,1436.07 507.2,1436.07 510.72,1432.56 510.72,1376.09 538.6,1348.2 809.16,1348.2 837.59,1319.77 849.19,1308.18 849.19,1068.58 840.33,1059.72 840.33,1036.09 839.82,1035.58 839.82,1020.97 U1.47
RGB_1: R17.1 U1.2 | length 225.9
  Top Layer w7.87: U1.2@673.39,971.53 665.11,971.53 U1.2 689.53,971.89 701.56,959.86 v1@708.66,952.76
  Bottom Layer w7.87: R17.1 612.59,1000 659.83,952.76 v1@708.66,952.76
  other v1: 708.66,950.79
RGB_2: R19.1 U1.3 | length 108.1
  Top Layer w7.87: v1(620.08,951.77) 622.74,951.77 627.11,956.14 U1.3
  Bottom Layer w10: R19.1 598.71,940.94 599.08,941.31 606.95,941.31 617.42,951.77 v1(620.08,951.77)
RGB_3: R20.1 U1.4 | length 205.9
  Top Layer w7.87: U1.4 665.11,940.03 685.95,940.03 v1@704.72,921.26
  Bottom Layer w7.87: R20.1 621.06,881.89 660.43,921.26 v1@704.72,921.26
  other v1: 708.66,921.26
RST: C14.2 J3.4 R6.1 R10.2 U1.26 | length 1037.1
  Top Layer w7.87: U1.26 870.95,687.61 892.22,666.34 v1(919.29,666.34) 996.41,666.34 1007.24,677.17 1082.68,677.17 1102.36,657.48 1102.36,472.44 1158.27,416.54 J3.4
  Top Layer w10: v1(913.39,555.12) 913.39,484.91 935.7,462.6 R10.2
  Bottom Layer w7.87: C14.2@889.76,681.1 893.7,677.17 901.27,677.17 908.46,677.17 v1(919.29,666.34) ; v1(913.39,555.12) 913.39,557.78 919.29,563.69 v1(919.29,666.34) ; R6.1 944.9,681.12 934.07,681.12 v1(919.29,666.34)
SWCLK_24: J3.2 U1.24 | length 921.9
  Top Layer w7.87: U1.24 839.46,714.27 839.68,714.05 839.68,656.38 868.98,627.08 1042.21,627.08 1055.12,614.17 1055.12,275.59 1110.24,220.47 1283.46,220.47 J3.2
SWDIO_25: J3.3 U1.25 | length 816.3
  Top Layer w7.87: U1.25 855.21,668.42 877.95,645.67 1062.99,645.67 1078.74,629.92 1078.74,362.2 1124.41,316.54 J3.3
VUSB: C17.2 C19.2 D1.K D3.3 J1.1 J2.1 U3.1 | length 1561.5
  Top Layer w19.68: J2.1@106.36,2052.03 208.75,2052.03 319.77,1941.01 ; D3.3@319.77,1524.5 319.77,1941.01 ; v1@499.94,1978.41 429.81,1978.41 428.71,1979.5 391.93,1979.5 390.84,1978.41 357.17,1978.41 319.77,1941.01 ; v1(500,1978.35) v1(528.54,1978.35) ; v1@528.6,1978.41 545.36,1978.41 559.05,1964.72 J1.1 559.05,1885.61 570.59,1874.08 767.78,1874.08 D1.K 785.43,1889.76 818.9,1856.3 818.9,1854.33 838.58,1834.65 C19.2 837.17,1730.87 837.17,1651.02 U3.1
  Bottom Layer w19.68: v1(528.54,1978.35) C17.2@528.54,2022.64
XIN: C15.2 U1.20 Y1.1 | length 472.6
  Top Layer w7.87: C15.2 597.44,451.77 Y1.1 ; Y1.1@612.2,460.63 620.08,468.5 635.83,468.5 654.53,487.2 654.53,615.16 676.18,636.81 734.25,636.81 758.86,661.42 758.86,713.58 776.47,731.19 U1.20
XOUT: R11.2 U1.21 | length 164.7
  Top Layer w7.87: R11.2 750.98,604.33 776.57,629.92 776.57,705.71 792.21,721.35 U1.21
XOUT_R: C16.2 R11.1 Y1.3 | length 167.7
  Top Layer w7.87: R11.1 711.61,600.39 698.82,587.6 698.82,527.56 710.69,539.43 768.7,539.43 C16.2@781.5,539.43
pads on no net: J1.4 J1.6 J1.7 J1.8 J1.9 J1.10 J1.11

## Polygon pours and split planes (outlines as drawn)
GND on Top Layer "GND_L01_P006" (solid, pour order 6): 0,0 1385.83,0 1385.83,2165.35 0,2165.35
+3V3 on Top Layer "+3V3_L01_P000" (solid, pour order 0): 972.44,1590.55 1059.06,1590.55 1059.06,1543.31 1133.86,1543.31 1133.86,1480.32 1059.06,1480.32 1059.06,1354.33 791.34,1354.33 791.34,1590.55 874.02,1590.55 874.02,1696.85 972.44,1696.85
GND on Top Layer "GND_L01_P001" (solid, pour order 1): 874.02,1708.66 874.02,1779.53 1141.73,1779.53 1141.73,1555.12 1070.87,1555.12 1070.87,1602.36 984.25,1602.36 984.25,1708.66 964.57,1708.66
GND on Bottom Layer "GND_L04_P005" (solid, pour order 5): 0,0 1385.83,0 1385.83,2165.35 0,2165.35
+3V3 on Bottom Layer "+3V3_L04_P004" (solid, pour order 4): 791.34,1393.7 1066.93,1393.7 1066.93,1629.92 791.34,1629.92
+3V3 on Int2 (PWR) (split plane): 1365.73,20.1 20.1,20.1 20.1,2145.26 1365.73,2145.26
GND on Int1 (GND) (split plane): 1365.73,20.1 20.1,20.1 20.1,2145.26 1365.73,2145.26

## Silkscreen, mask and mechanical layers (free items; w line width, h text height)
Top Overlay:
  text "VUSB" at 169.29,1996.99 h50
  text "G" at 1055.12,1960.77 h50
  text "G" at 169.29,1896.91 h50
  text "IO29" at 1055.12,1860.69 h50
  text "IO3" at 169.29,1796.82 h50
  text "3v3" at 958.28,1791.23 h50
  text "IO28" at 1047.85,1760.77 h50
  text "IO4" at 169.29,1696.74 h50
  text "IO27" at 1050.81,1661.36 h50
  text "IO5" at 169.29,1649.98 h50
  text "RGB" at 257.27,1574.72 h50
  text "IO26" at 1199.8,1565.92 h50 r90
  text "IO6" at 169.29,1496.57 h50
  text "G" at 1050.81,1460.57 h50
  text "G" at 169.29,1396.49 h50
  text "NOR FLASH" at 318.79,1370.93 h50 r270
  text "25" at 1051.79,1359.19 h50
  text "IO7" at 169.29,1296.41 h50
  text "IO24" at 1055.12,1260.19 h50
  text "IO8" at 169.29,1196.33 h50
  text "IO23" at 1055.12,1160.11 h50
  text "IO9" at 169.29,1096.24 h50
  text "IO22" at 1055.12,1060.02 h50
  text "IO10" at 169.29,996.16 h50
  text "IO21" at 1055.12,959.94 h50
  text "G" at 169.29,896.08 h50
  text "IO20" at 1051.79,860.18 h50
  text "RP2040 / TB / V1.0" at 318.9,827.55 h50
  text "IO11" at 169.29,795.99 h50
  text "IO19" at 1054.74,756.83 h50
  text "IO12" at 169.29,695.91 h50
  text "IO18" at 1055.12,659.69 h50
  text "A.Sherif / (0)^(0)" at 314.96,639.83 h50
  text "IO13" at 169.29,595.83 h50
  text "IO17" at 1055.12,559.61 h50
  text "IO14" at 169.29,495.75 h50
  text "IO16" at 1055.12,459.53 h50
  text "IO15" at 169.29,395.66 h50
  text "RST" at 1055.12,359.44 h50
  text "+3" at 169.29,295.58 h50
  text "SWDIO" at 1055.07,259.36 h50
  text "+3" at 169.29,195.5 h50
  text "SWCLK" at 1055.12,159.28 h50
  text "G" at 169.29,95.42 h50
  text "BOOT" at 348.46,60.38 h50
  text "G" at 1055.12,59.19 h50
  text "RSET" at 879.95,52.5 h50